# Altium PCB Pod_Islands_Panel.PcbDoc (part 5 of 10)
Units mm, origin at the board's own origin, x right, y up, seen from the top; angles counter-clockwise.
Board outline 95.7 x 83.7 mm, 6 copper layers (Top Layer, Inner1, Inner2, Inner3, Inner4, Bottom Layer), stack 0.82 mm thick; 1100 components, 940 nets, 4944 pads, 3680 vias.
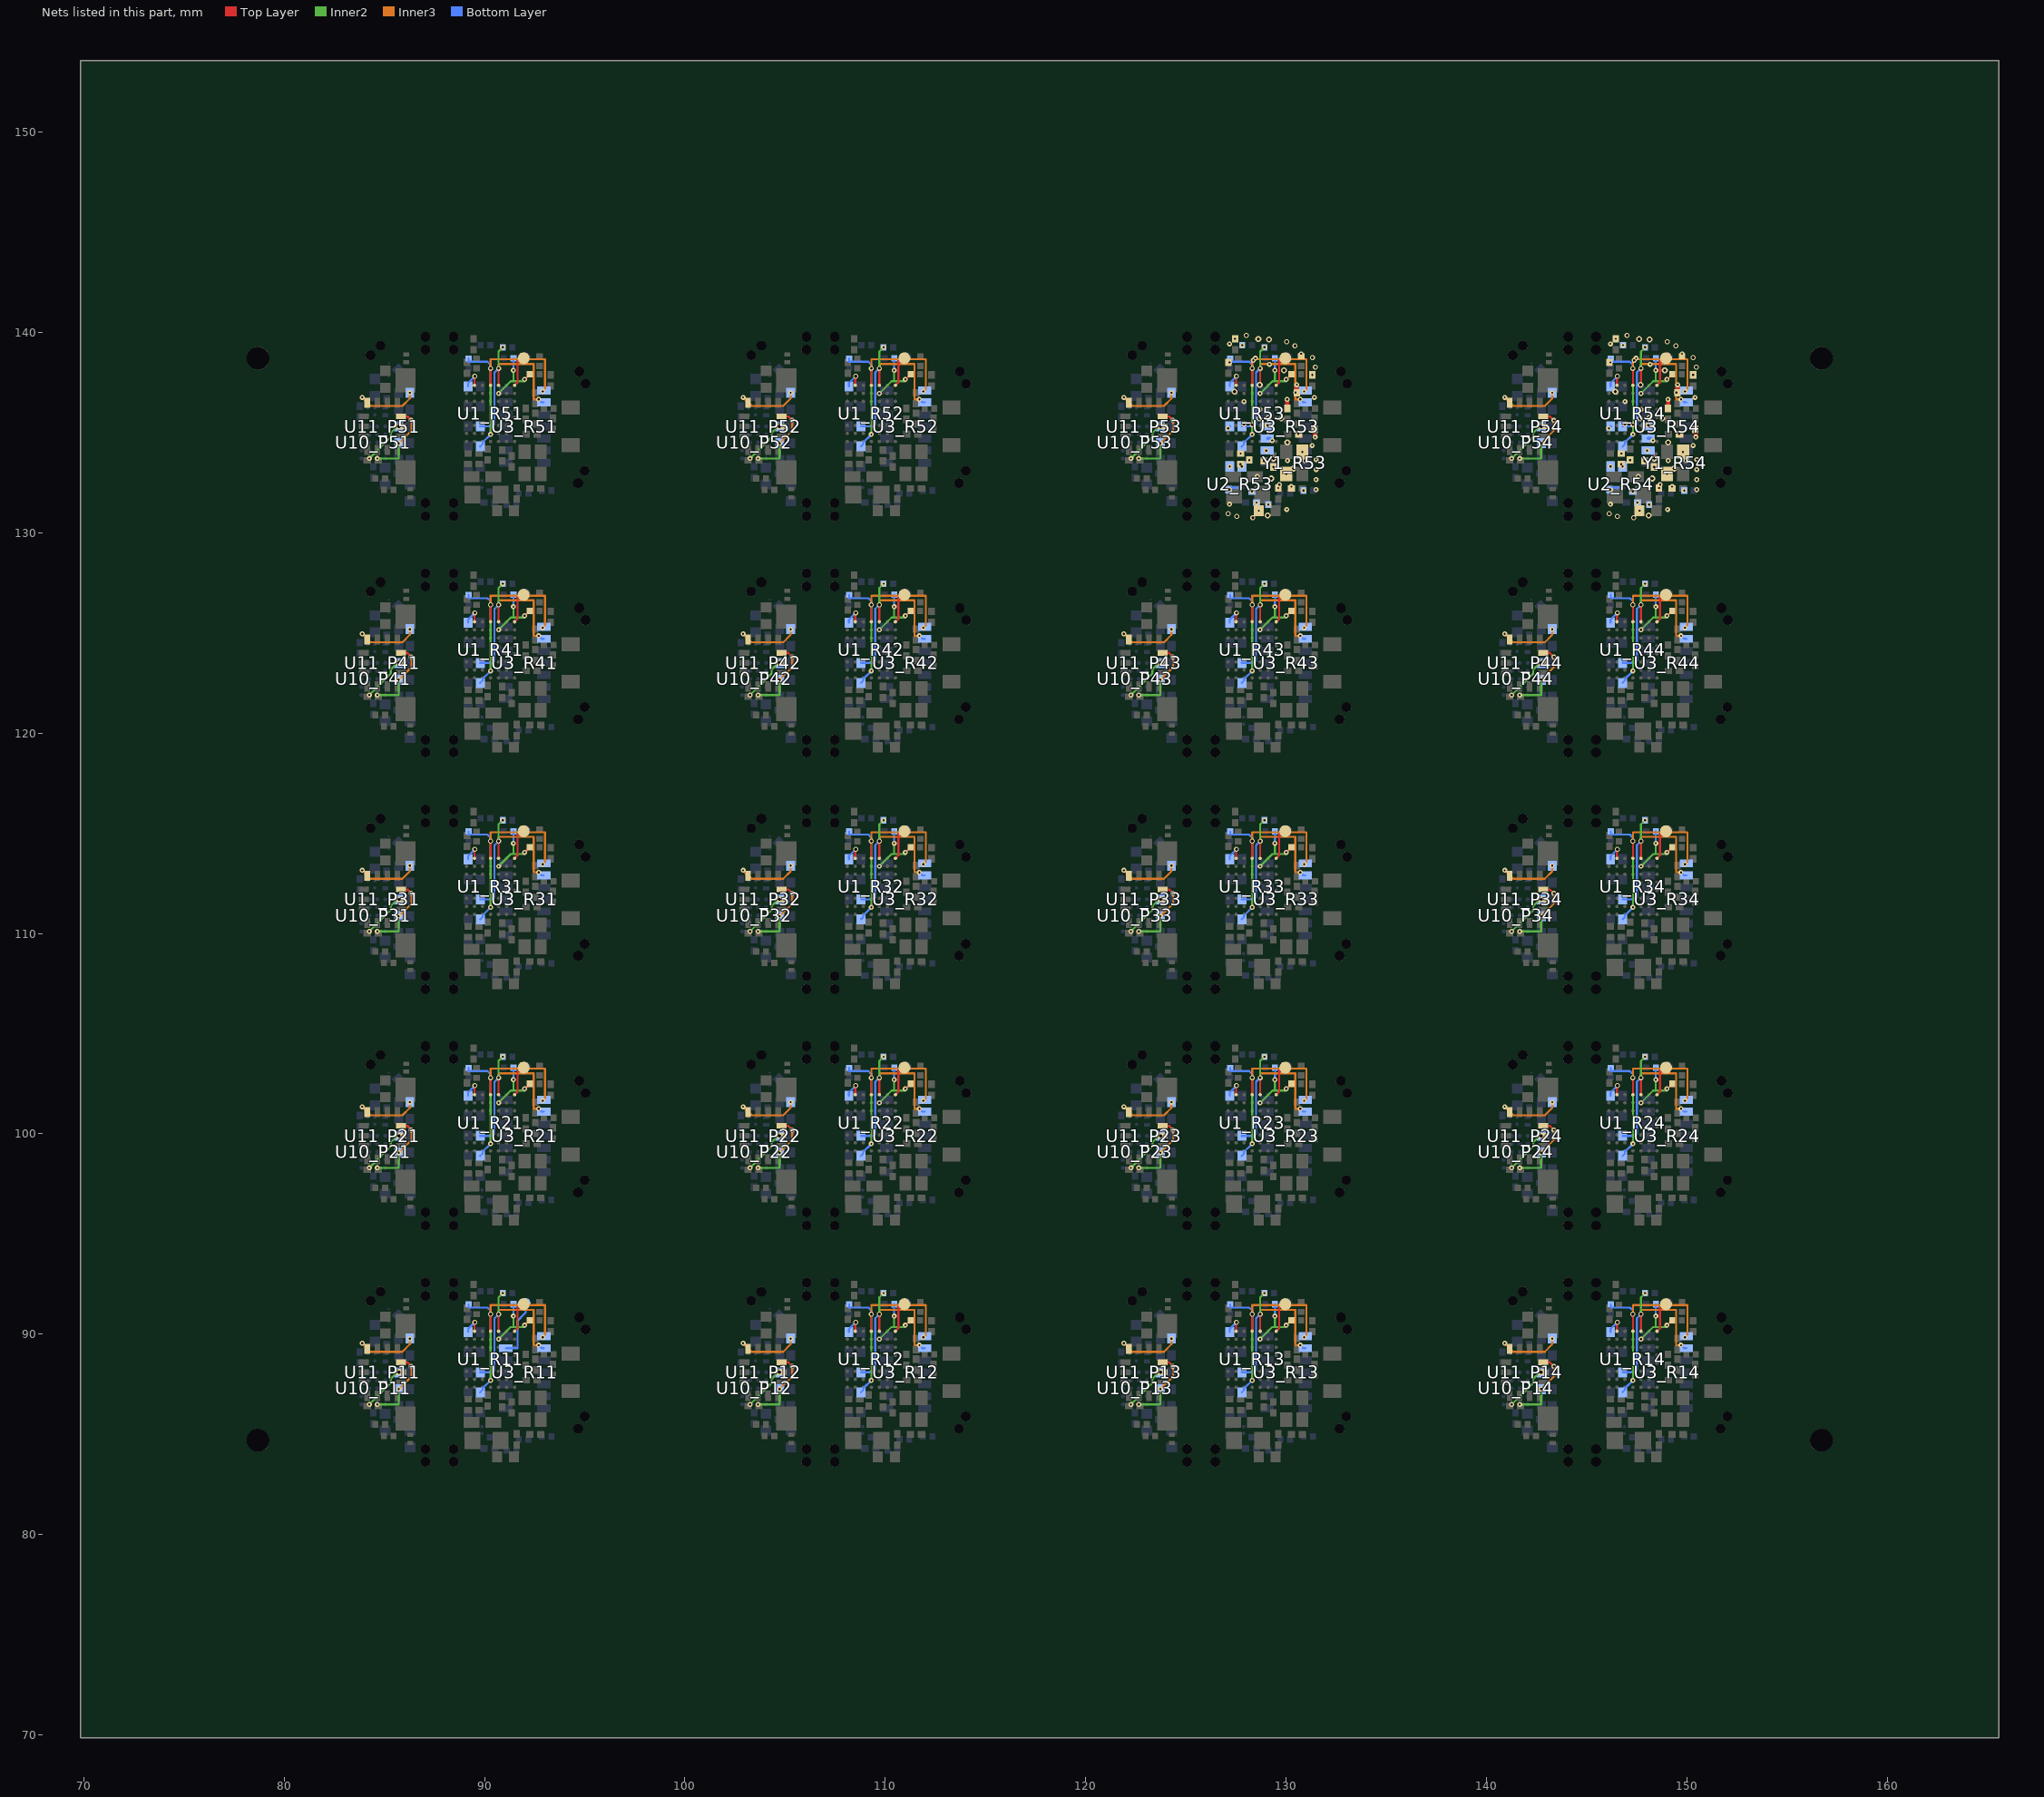
[diagram p9: the nets of this part, all layers, seen from the top]

## Via types
v1: diameter 0.249, hole 0.102, Top Layer to Inner1, 920 vias
v2: diameter 0.249, hole 0.102, Inner1 to Bottom Layer, 740 vias
v3: diameter 0.249, hole 0.102, Top Layer to Inner4, 580 vias
v4: diameter 0.249, hole 0.152, Top Layer to Bottom Layer, 540 vias
v5: diameter 0.249, hole 0.102, Inner4 to Bottom Layer, 520 vias
v6: diameter 0.3, hole 0.152, Inner1 to Inner4, 380 vias

## Nets (pads, with @x,y where several pads share a name; then routed paths per layer and width w, separated by ;. In a path a pad name is that pad's centre, name@x,y a point inside that pad or via, vN(x,y) a via of type N, cw(c..) or ccw(c..) an arc to the next point about the centre after c; other vN are vias at no path point) (continued)
GND_R53: C1_R53.2 C2_R53.2 C3_R53.2 C4_R53.2 C5_R53.2 C6_R53.2 C7_R53.2 C8_R53.2 C9_R53.2 C10_R53.2 C12_R53.2 C20_R53.2 C21_R53.2 C30_R53.2 C31_R53.2 C32_R53.2 C40_R53.2 C42_R53.2 pad.JR1@127.186,133.301 pad.JR3@127.186,135.3 pad.JR6@127.785,133.301 R5_R53.2 R41_R53.2 TH1_R53.2 TH4_R53.2 U1_R53.C4 U1_R53.C5 U1_R53.D2 U1_R53.E3 U1_R53.F5 U2_R53.B2 U3_R53.9 U3_R53.10 U3_R53.11 Y1_R53.2 Y1_R53.4 | length 2.1
  Top Layer w0.15: U1_R53.C4@128.3,135.35 v1(128.3,135.38)
  Top Layer w0.2: C3_R53.2@130.05,136.201 v1(130.05,136.65) ; C42_R53.2@130.53,136.986 v1(130.53,137.386) ; C40_R53.2@131.412,135.154 v1(131.442,134.764)
  Bottom Layer w0.15: v5(127.1,135.2) 127.185,135.285 pad.JR3@127.185,135.299 ; v2(127.176,132.147) 127.228,132.246 U2_R53.B2@127.525,132.245 ; U3_R53.10@129.06,134.7 129.2,134.7 v5(129.3,134.6)
  other v1: 128.63,131.09 130.03,131.16 131.485,132.15 129.601,132.223 130.256,132.3 131.485,132.65 129.999,132.929 131.485,133.15 129.359,133.275 127.718,133.42 128.88,133.577 128.16,133.623 131.485,133.65 127.723,133.95 130.799,134.031 131.3,134.35 130.6,134.93 127.899,135.41 129.1,135.751 128.699,136.15 127.899,136.549 131.4,136.75 130.47,136.986 131.3,137.875 129.16,138.4 127.172,138.494 128.36,138.6
  other v2: 127.176,131.415 127.176,139.42
  other v3: 130.751,138.922 127.449,139.676
  other v4: 128.336,130.739 127.529,130.806 127.11,130.95 131.46,138.25 131.306,138.731 130.442,139.325 130.021,139.523 128.01,139.85
  other v5: 130.03,131.16 129.108,131.4 128.524,131.499 128.295,132.05 130.858,132.101 129.66,132.4 128.56,132.8 127.185,133.3 127.784,133.3 130.06,133.6 129.01,134.09 129.06,135.359 128.46,138.7 127.807,139.35
  other v6: 129.081,130.865 129.26,132.7 130.36,133.2 130.96,133.6 129.37,133.7 130.06,134.5 128.66,135.7 129.76,135.7 127.42,137.035 128.676,137.374 129.89,138.1 129.135,139.639 128.611,139.669
GND_R54: C1_R54.2 C2_R54.2 C3_R54.2 C4_R54.2 C5_R54.2 C6_R54.2 C7_R54.2 C8_R54.2 C9_R54.2 C10_R54.2 C12_R54.2 C20_R54.2 C21_R54.2 C30_R54.2 C31_R54.2 C32_R54.2 C40_R54.2 C42_R54.2 pad.JR1@146.185,133.301 pad.JR3@146.185,135.3 pad.JR6@146.785,133.301 R5_R54.2 R41_R54.2 TH1_R54.2 TH4_R54.2 U1_R54.C4 U1_R54.C5 U1_R54.D2 U1_R54.E3 U1_R54.F5 U2_R54.B2 U3_R54.9 U3_R54.10 U3_R54.11 Y1_R54.2 Y1_R54.4 | length 2.1
  Top Layer w0.15: U1_R54.C4@147.3,135.35 v1(147.3,135.38)
  Top Layer w0.2: C3_R54.2@149.05,136.201 v1(149.05,136.65) ; C42_R54.2@149.53,136.986 v1(149.53,137.386) ; C40_R54.2@150.412,135.154 v1(150.442,134.764)
  Bottom Layer w0.15: v5(146.1,135.2) 146.185,135.285 pad.JR3@146.185,135.299 ; v2(146.176,132.147) 146.228,132.246 U2_R54.B2@146.525,132.245 ; U3_R54.10@148.06,134.7 148.2,134.7 v5(148.3,134.6)
  other v1: 147.63,131.09 149.03,131.16 150.485,132.15 148.601,132.223 149.256,132.3 150.485,132.65 148.999,132.929 150.485,133.15 148.359,133.275 146.718,133.42 147.88,133.577 147.16,133.623 150.485,133.65 146.723,133.95 149.799,134.031 150.3,134.35 149.6,134.93 146.899,135.41 148.1,135.751 147.699,136.15 146.899,136.549 150.4,136.75 149.47,136.986 150.3,137.875 148.16,138.4 146.172,138.494 147.36,138.6
  other v2: 146.176,131.415 146.176,139.42
  other v3: 149.751,138.922 146.449,139.676
  other v4: 147.336,130.739 146.529,130.806 146.11,130.95 150.46,138.25 150.306,138.731 149.442,139.325 149.021,139.523 147.01,139.85
  other v5: 149.03,131.16 148.108,131.4 147.524,131.499 147.295,132.05 149.858,132.101 148.66,132.4 147.56,132.8 146.185,133.3 146.784,133.3 149.06,133.6 148.01,134.09 148.06,135.359 147.46,138.7 146.807,139.35
  other v6: 148.081,130.865 148.26,132.7 149.36,133.2 149.96,133.6 148.37,133.7 149.06,134.5 147.66,135.7 148.76,135.7 146.42,137.035 147.676,137.374 148.89,138.1 148.135,139.639 147.611,139.669
I2C_SCL_P11: pad.JP8@85.723,88.099 U10_P11.E3 U11_P11.13 | length 2.3
  Inner2 w0.1: v2(84.251,86.499) 85.325,87.573 85.325,87.775 85.649,88.099 v4(85.724,88.099)
I2C_SCL_P12: pad.JP8@104.725,88.099 U10_P12.E3 U11_P12.13 | length 2.3
  Inner2 w0.1: v2(103.251,86.499) 104.325,87.573 104.325,87.775 104.649,88.099 v4(104.724,88.099)
I2C_SCL_P13: pad.JP8@123.724,88.099 U10_P13.E3 U11_P13.13 | length 2.3
  Inner2 w0.1: v2(122.251,86.499) 123.325,87.573 123.325,87.775 123.649,88.099 v4(123.724,88.099)
I2C_SCL_P14: pad.JP8@142.723,88.099 U10_P14.E3 U11_P14.13 | length 2.3
  Inner2 w0.1: v2(141.251,86.499) 142.325,87.573 142.325,87.775 142.649,88.099 v4(142.724,88.099)
I2C_SCL_P21: pad.JP8@85.723,99.9 U10_P21.E3 U11_P21.13 | length 2.3
  Inner2 w0.1: v2(84.251,98.299) 85.325,99.373 85.325,99.575 85.649,99.899 v4(85.724,99.899)
I2C_SCL_P22: pad.JP8@104.725,99.9 U10_P22.E3 U11_P22.13 | length 2.3
  Inner2 w0.1: v2(103.251,98.299) 104.325,99.373 104.325,99.575 104.649,99.899 v4(104.724,99.899)
I2C_SCL_P23: pad.JP8@123.724,99.9 U10_P23.E3 U11_P23.13 | length 2.3
  Inner2 w0.1: v2(122.251,98.299) 123.325,99.373 123.325,99.575 123.649,99.899 v4(123.724,99.899)
I2C_SCL_P24: pad.JP8@142.723,99.9 U10_P24.E3 U11_P24.13 | length 2.3
  Inner2 w0.1: v2(141.251,98.299) 142.325,99.373 142.325,99.575 142.649,99.899 v4(142.724,99.899)
I2C_SCL_P31: pad.JP8@85.723,111.698 U10_P31.E3 U11_P31.13 | length 2.3
  Inner2 w0.1: v2(84.251,110.099) 85.325,111.173 85.325,111.375 85.649,111.699 v4(85.724,111.699)
I2C_SCL_P32: pad.JP8@104.725,111.698 U10_P32.E3 U11_P32.13 | length 2.3
  Inner2 w0.1: v2(103.251,110.099) 104.325,111.173 104.325,111.375 104.649,111.699 v4(104.724,111.699)
I2C_SCL_P33: pad.JP8@123.724,111.698 U10_P33.E3 U11_P33.13 | length 2.3
  Inner2 w0.1: v2(122.251,110.099) 123.325,111.173 123.325,111.375 123.649,111.699 v4(123.724,111.699)
I2C_SCL_P34: pad.JP8@142.723,111.698 U10_P34.E3 U11_P34.13 | length 2.3
  Inner2 w0.1: v2(141.251,110.099) 142.325,111.173 142.325,111.375 142.649,111.699 v4(142.724,111.699)
I2C_SCL_P41: pad.JP8@85.723,123.499 U10_P41.E3 U11_P41.13 | length 2.3
  Inner2 w0.1: v2(84.251,121.899) 85.325,122.973 85.325,123.175 85.649,123.499 v4(85.724,123.499)
I2C_SCL_P42: pad.JP8@104.725,123.499 U10_P42.E3 U11_P42.13 | length 2.3
  Inner2 w0.1: v2(103.251,121.899) 104.325,122.973 104.325,123.175 104.649,123.499 v4(104.724,123.499)
I2C_SCL_P43: pad.JP8@123.724,123.499 U10_P43.E3 U11_P43.13 | length 2.3
  Inner2 w0.1: v2(122.251,121.899) 123.325,122.973 123.325,123.175 123.649,123.499 v4(123.724,123.499)
I2C_SCL_P44: pad.JP8@142.723,123.499 U10_P44.E3 U11_P44.13 | length 2.3
  Inner2 w0.1: v2(141.251,121.899) 142.325,122.973 142.325,123.175 142.649,123.499 v4(142.724,123.499)
I2C_SCL_P51: pad.JP8@85.723,135.3 U10_P51.E3 U11_P51.13 | length 2.3
  Inner2 w0.1: v2(84.251,133.699) 85.325,134.773 85.325,134.975 85.649,135.299 v4(85.724,135.299)
I2C_SCL_P52: pad.JP8@104.725,135.3 U10_P52.E3 U11_P52.13 | length 2.3
  Inner2 w0.1: v2(103.251,133.699) 104.325,134.773 104.325,134.975 104.649,135.299 v4(104.724,135.299)
I2C_SCL_P53: pad.JP8@123.724,135.3 U10_P53.E3 U11_P53.13 | length 2.3
  Inner2 w0.1: v2(122.251,133.699) 123.325,134.773 123.325,134.975 123.649,135.299 v4(123.724,135.299)
I2C_SCL_P54: pad.JP8@142.723,135.3 U10_P54.E3 U11_P54.13 | length 2.3
  Inner2 w0.1: v2(141.251,133.699) 142.325,134.773 142.325,134.975 142.649,135.299 v4(142.724,135.299)
I2C_SCL_R11: pad.JR8@89.784,88.099 R2_R11.2 U1_R11.H3 U3_R11.2 | length 9.9
  Top Layer w0.1: U1_R11.H3@90.699,90.149 v4(90.7,91)
  Inner2 w0.1: v4(90.7,91) 90.7,91.839 v2(90.91,92.049)
  Inner3 w0.1: v4(90.7,91) 90.7,91.22 92.45,91.22 92.45,89.45 v2(92.7,89.45)
  Bottom Layer w0.1: pad.JR8@89.784,88.099 90.4,88.099 90.5,88.2 90.5,90.8 v4(90.7,91) ; v2(92.7,89.45) 92.85,89.301 U3_R11.2@92.959,89.301
I2C_SCL_R12: pad.JR8@108.784,88.099 R2_R12.2 U1_R12.H3 U3_R12.2 | length 9.9
  Top Layer w0.1: U1_R12.H3@109.7,90.15 v4(109.7,91)
  Inner2 w0.1: v4(109.7,91) 109.7,91.839 v2(109.91,92.049)
  Inner3 w0.1: v4(109.7,91) 109.7,91.22 111.45,91.22 111.45,89.45 v2(111.7,89.45)
  Bottom Layer w0.1: pad.JR8@108.784,88.099 109.4,88.099 109.5,88.2 109.5,90.8 v4(109.7,91) ; v2(111.7,89.45) 111.85,89.301 U3_R12.2@111.959,89.301
I2C_SCL_R13: pad.JR8@127.785,88.099 R2_R13.2 U1_R13.H3 U3_R13.2 | length 9.9
  Top Layer w0.1: U1_R13.H3@128.7,90.15 v4(128.7,91)
  Inner2 w0.1: v4(128.7,91) 128.7,91.839 v2(128.91,92.049)
  Inner3 w0.1: v4(128.7,91) 128.7,91.22 130.45,91.22 130.45,89.45 v2(130.7,89.45)
  Bottom Layer w0.1: pad.JR8@127.785,88.099 128.4,88.099 128.5,88.2 128.5,90.8 v4(128.7,91) ; v2(130.7,89.45) 130.85,89.301 U3_R13.2@130.959,89.301
I2C_SCL_R14: pad.JR8@146.785,88.099 R2_R14.2 U1_R14.H3 U3_R14.2 | length 9.9
  Top Layer w0.1: U1_R14.H3@147.699,90.149 v4(147.7,91)
  Inner2 w0.1: v4(147.7,91) 147.7,91.839 v2(147.91,92.049)
  Inner3 w0.1: v4(147.7,91) 147.7,91.22 149.45,91.22 149.45,89.45 v2(149.7,89.45)
  Bottom Layer w0.1: pad.JR8@146.785,88.099 147.4,88.099 147.5,88.2 147.5,90.8 v4(147.7,91) ; v2(149.7,89.45) 149.85,89.301 U3_R14.2@149.959,89.301
I2C_SCL_R21: pad.JR8@89.784,99.9 R2_R21.2 U1_R21.H3 U3_R21.2 | length 9.9
  Top Layer w0.1: U1_R21.H3@90.699,101.949 v4(90.7,102.8)
  Inner2 w0.1: v4(90.7,102.8) 90.7,103.639 v2(90.91,103.849)
  Inner3 w0.1: v4(90.7,102.8) 90.7,103.02 92.45,103.02 92.45,101.25 v2(92.7,101.25)
  Bottom Layer w0.1: pad.JR8@89.784,99.899 90.4,99.899 90.5,100 90.5,102.6 v4(90.7,102.8) ; v2(92.7,101.25) 92.85,101.101 U3_R21.2@92.96,101.1
I2C_SCL_R22: pad.JR8@108.784,99.9 R2_R22.2 U1_R22.H3 U3_R22.2 | length 9.9
  Top Layer w0.1: U1_R22.H3@109.699,101.949 v4(109.7,102.8)
  Inner2 w0.1: v4(109.7,102.8) 109.7,103.639 v2(109.91,103.849)
  Inner3 w0.1: v4(109.7,102.8) 109.7,103.02 111.45,103.02 111.45,101.25 v2(111.7,101.25)
  Bottom Layer w0.1: pad.JR8@108.784,99.899 109.4,99.899 109.5,100 109.5,102.6 v4(109.7,102.8) ; v2(111.7,101.25) 111.85,101.101 U3_R22.2@111.96,101.1
I2C_SCL_R23: pad.JR8@127.785,99.9 R2_R23.2 U1_R23.H3 U3_R23.2 | length 9.9
  Top Layer w0.1: U1_R23.H3@128.699,101.949 v4(128.7,102.8)
  Inner2 w0.1: v4(128.7,102.8) 128.7,103.639 v2(128.91,103.849)
  Inner3 w0.1: v4(128.7,102.8) 128.7,103.02 130.45,103.02 130.45,101.25 v2(130.7,101.25)
  Bottom Layer w0.1: pad.JR8@127.784,99.899 128.4,99.899 128.5,100 128.5,102.6 v4(128.7,102.8) ; v2(130.7,101.25) 130.85,101.101 U3_R23.2@130.96,101.1
I2C_SCL_R24: pad.JR8@146.785,99.9 R2_R24.2 U1_R24.H3 U3_R24.2 | length 9.9
  Top Layer w0.1: U1_R24.H3@147.699,101.949 v4(147.7,102.8)
  Inner2 w0.1: v4(147.7,102.8) 147.7,103.639 v2(147.91,103.849)
  Inner3 w0.1: v4(147.7,102.8) 147.7,103.02 149.45,103.02 149.45,101.25 v2(149.7,101.25)
  Bottom Layer w0.1: pad.JR8@146.784,99.899 147.4,99.899 147.5,100 147.5,102.6 v4(147.7,102.8) ; v2(149.7,101.25) 149.85,101.101 U3_R24.2@149.96,101.1
I2C_SCL_R31: pad.JR8@89.784,111.698 R2_R31.2 U1_R31.H3 U3_R31.2 | length 9.9
  Top Layer w0.1: U1_R31.H3@90.699,113.749 v4(90.7,114.6)
  Inner2 w0.1: v4(90.7,114.6) 90.7,115.439 v2(90.91,115.649)
  Inner3 w0.1: v4(90.7,114.6) 90.7,114.82 92.45,114.82 92.45,113.05 v2(92.7,113.05)
  Bottom Layer w0.1: pad.JR8@89.784,111.698 90.4,111.699 90.5,111.8 90.5,114.4 v4(90.7,114.6) ; v2(92.7,113.05) 92.85,112.901 U3_R31.2@92.96,112.9
I2C_SCL_R32: pad.JR8@108.784,111.698 R2_R32.2 U1_R32.H3 U3_R32.2 | length 9.9
  Top Layer w0.1: U1_R32.H3@109.7,113.75 v4(109.7,114.6)
  Inner2 w0.1: v4(109.7,114.6) 109.7,115.439 v2(109.91,115.649)
  Inner3 w0.1: v4(109.7,114.6) 109.7,114.82 111.45,114.82 111.45,113.05 v2(111.7,113.05)
  Bottom Layer w0.1: pad.JR8@108.784,111.699 109.4,111.699 109.5,111.8 109.5,114.4 v4(109.7,114.6) ; v2(111.7,113.05) 111.85,112.901 U3_R32.2@111.96,112.9
I2C_SCL_R33: pad.JR8@127.785,111.698 R2_R33.2 U1_R33.H3 U3_R33.2 | length 9.9
  Top Layer w0.1: U1_R33.H3@128.7,113.75 v4(128.7,114.6)
  Inner2 w0.1: v4(128.7,114.6) 128.7,115.439 v2(128.91,115.649)
  Inner3 w0.1: v4(128.7,114.6) 128.7,114.82 130.45,114.82 130.45,113.05 v2(130.7,113.05)
  Bottom Layer w0.1: pad.JR8@127.785,111.698 128.4,111.699 128.5,111.8 128.5,114.4 v4(128.7,114.6) ; v2(130.7,113.05) 130.85,112.901 U3_R33.2@130.96,112.9
I2C_SCL_R34: pad.JR8@146.785,111.698 R2_R34.2 U1_R34.H3 U3_R34.2 | length 9.9
  Top Layer w0.1: U1_R34.H3@147.699,113.749 v4(147.7,114.6)
  Inner2 w0.1: v4(147.7,114.6) 147.7,115.439 v2(147.91,115.649)
  Inner3 w0.1: v4(147.7,114.6) 147.7,114.82 149.45,114.82 149.45,113.05 v2(149.7,113.05)
  Bottom Layer w0.1: pad.JR8@146.785,111.698 147.4,111.699 147.5,111.8 147.5,114.4 v4(147.7,114.6) ; v2(149.7,113.05) 149.85,112.901 U3_R34.2@149.96,112.9
I2C_SCL_R41: pad.JR8@89.784,123.499 R2_R41.2 U1_R41.H3 U3_R41.2 | length 9.9
  Top Layer w0.1: U1_R41.H3@90.699,125.549 v4(90.7,126.4)
  Inner2 w0.1: v4(90.7,126.4) 90.7,127.239 v2(90.91,127.449)
  Inner3 w0.1: v4(90.7,126.4) 90.7,126.62 92.45,126.62 92.45,124.85 v2(92.7,124.85)
  Bottom Layer w0.1: pad.JR8@89.784,123.499 90.4,123.499 90.5,123.6 90.5,126.2 v4(90.7,126.4) ; v2(92.7,124.85) 92.85,124.701 U3_R41.2@92.959,124.701
I2C_SCL_R42: pad.JR8@108.784,123.499 R2_R42.2 U1_R42.H3 U3_R42.2 | length 9.9
  Top Layer w0.1: U1_R42.H3@109.7,125.55 v4(109.7,126.4)
  Inner2 w0.1: v4(109.7,126.4) 109.7,127.239 v2(109.91,127.449)
  Inner3 w0.1: v4(109.7,126.4) 109.7,126.62 111.45,126.62 111.45,124.85 v2(111.7,124.85)
  Bottom Layer w0.1: pad.JR8@108.784,123.499 109.4,123.499 109.5,123.6 109.5,126.2 v4(109.7,126.4) ; v2(111.7,124.85) 111.85,124.701 U3_R42.2@111.959,124.701
I2C_SCL_R43: pad.JR8@127.785,123.499 R2_R43.2 U1_R43.H3 U3_R43.2 | length 9.9
  Top Layer w0.1: U1_R43.H3@128.7,125.55 v4(128.7,126.4)
  Inner2 w0.1: v4(128.7,126.4) 128.7,127.239 v2(128.91,127.449)
  Inner3 w0.1: v4(128.7,126.4) 128.7,126.62 130.45,126.62 130.45,124.85 v2(130.7,124.85)
  Bottom Layer w0.1: pad.JR8@127.785,123.499 128.4,123.499 128.5,123.6 128.5,126.2 v4(128.7,126.4) ; v2(130.7,124.85) 130.85,124.701 U3_R43.2@130.959,124.701
I2C_SCL_R44: pad.JR8@146.785,123.499 R2_R44.2 U1_R44.H3 U3_R44.2 | length 9.9
  Top Layer w0.1: U1_R44.H3@147.699,125.549 v4(147.7,126.4)
  Inner2 w0.1: v4(147.7,126.4) 147.7,127.239 v2(147.91,127.449)
  Inner3 w0.1: v4(147.7,126.4) 147.7,126.62 149.45,126.62 149.45,124.85 v2(149.7,124.85)
  Bottom Layer w0.1: pad.JR8@146.785,123.499 147.4,123.499 147.5,123.6 147.5,126.2 v4(147.7,126.4) ; v2(149.7,124.85) 149.85,124.701 U3_R44.2@149.959,124.701
I2C_SCL_R51: pad.JR8@89.784,135.3 R2_R51.2 U1_R51.H3 U3_R51.2 | length 9.9
  Top Layer w0.1: U1_R51.H3@90.699,137.349 v4(90.7,138.2)
  Inner2 w0.1: v4(90.7,138.2) 90.7,139.039 v2(90.91,139.249)
  Inner3 w0.1: v4(90.7,138.2) 90.7,138.42 92.45,138.42 92.45,136.65 v2(92.7,136.65)
  Bottom Layer w0.1: pad.JR8@89.784,135.299 90.4,135.299 90.5,135.4 90.5,138 v4(90.7,138.2) ; v2(92.7,136.65) 92.85,136.501 U3_R51.2@92.96,136.5
I2C_SCL_R52: pad.JR8@108.784,135.3 R2_R52.2 U1_R52.H3 U3_R52.2 | length 9.9
  Top Layer w0.1: U1_R52.H3@109.699,137.349 v4(109.7,138.2)
  Inner2 w0.1: v4(109.7,138.2) 109.7,139.039 v2(109.91,139.249)
  Inner3 w0.1: v4(109.7,138.2) 109.7,138.42 111.45,138.42 111.45,136.65 v2(111.7,136.65)
  Bottom Layer w0.1: pad.JR8@108.784,135.299 109.4,135.299 109.5,135.4 109.5,138 v4(109.7,138.2) ; v2(111.7,136.65) 111.85,136.501 U3_R52.2@111.96,136.5
I2C_SCL_R53: pad.JR8@127.785,135.3 R2_R53.2 U1_R53.H3 U3_R53.2 | length 9.9
  Top Layer w0.1: U1_R53.H3@128.699,137.349 v4(128.7,138.2)
  Inner2 w0.1: v4(128.7,138.2) 128.7,139.039 v2(128.91,139.249)
  Inner3 w0.1: v4(128.7,138.2) 128.7,138.42 130.45,138.42 130.45,136.65 v2(130.7,136.65)
  Bottom Layer w0.1: pad.JR8@127.784,135.299 128.4,135.299 128.5,135.4 128.5,138 v4(128.7,138.2) ; v2(130.7,136.65) 130.85,136.501 U3_R53.2@130.96,136.5
I2C_SCL_R54: pad.JR8@146.785,135.3 R2_R54.2 U1_R54.H3 U3_R54.2 | length 9.9
  Top Layer w0.1: U1_R54.H3@147.699,137.349 v4(147.7,138.2)
  Inner2 w0.1: v4(147.7,138.2) 147.7,139.039 v2(147.91,139.249)
  Inner3 w0.1: v4(147.7,138.2) 147.7,138.42 149.45,138.42 149.45,136.65 v2(149.7,136.65)
  Bottom Layer w0.1: pad.JR8@146.784,135.299 147.4,135.299 147.5,135.4 147.5,138 v4(147.7,138.2) ; v2(149.7,136.65) 149.85,136.501 U3_R54.2@149.96,136.5
I2C_SDA_P11: pad.JP7@85.723,87.261 U10_P11.E2 U11_P11.14 | length 3.8
  Top Layer w0.1: U11_P11.14@85.826,88.6 86.151,88.6 v3(86.35,88.4)
  Inner2 w0.1: v2(84.65,86.499) 85.724,86.499 v2(85.724,87.261)
  Inner3 w0.1: v2(85.724,87.261) 86.35,87.887 v3(86.35,88.4)
I2C_SDA_P12: pad.JP7@104.725,87.261 U10_P12.E2 U11_P12.14 | length 3.8
  Top Layer w0.1: U11_P12.14@104.825,88.6 105.151,88.6 v3(105.35,88.4)
  Inner2 w0.1: v2(103.65,86.499) 104.724,86.499 v2(104.724,87.261)
  Inner3 w0.1: v2(104.724,87.261) 105.35,87.887 v3(105.35,88.4)
I2C_SDA_P13: pad.JP7@123.724,87.261 U10_P13.E2 U11_P13.14 | length 3.8
  Top Layer w0.1: U11_P13.14@123.825,88.6 124.151,88.6 v3(124.35,88.4)
  Inner2 w0.1: v2(122.65,86.499) 123.724,86.499 v2(123.724,87.261)
  Inner3 w0.1: v2(123.724,87.261) 124.35,87.887 v3(124.35,88.4)
I2C_SDA_P14: pad.JP7@142.723,87.261 U10_P14.E2 U11_P14.14 | length 3.8
  Top Layer w0.1: U11_P14.14@142.826,88.6 143.151,88.6 v3(143.35,88.4)
  Inner2 w0.1: v2(141.65,86.499) 142.724,86.499 v2(142.724,87.261)
  Inner3 w0.1: v2(142.724,87.261) 143.35,87.887 v3(143.35,88.4)
I2C_SDA_P21: pad.JP7@85.723,99.062 U10_P21.E2 U11_P21.14 | length 3.8
  Top Layer w0.1: U11_P21.14@85.826,100.4 86.151,100.4 v3(86.35,100.2)
  Inner2 w0.1: v2(84.65,98.299) 85.724,98.299 v2(85.724,99.061)
  Inner3 w0.1: v2(85.724,99.061) 86.35,99.687 v3(86.35,100.2)
I2C_SDA_P22: pad.JP7@104.725,99.062 U10_P22.E2 U11_P22.14 | length 3.8
  Top Layer w0.1: U11_P22.14@104.826,100.4 105.151,100.4 v3(105.35,100.2)
  Inner2 w0.1: v2(103.65,98.299) 104.724,98.299 v2(104.724,99.061)
  Inner3 w0.1: v2(104.724,99.061) 105.35,99.687 v3(105.35,100.2)
I2C_SDA_P23: pad.JP7@123.724,99.062 U10_P23.E2 U11_P23.14 | length 3.8
  Top Layer w0.1: U11_P23.14@123.826,100.4 124.151,100.4 v3(124.35,100.2)
  Inner2 w0.1: v2(122.65,98.299) 123.724,98.299 v2(123.724,99.061)
  Inner3 w0.1: v2(123.724,99.061) 124.35,99.687 v3(124.35,100.2)
I2C_SDA_P24: pad.JP7@142.723,99.062 U10_P24.E2 U11_P24.14 | length 3.8
  Top Layer w0.1: U11_P24.14@142.826,100.4 143.151,100.4 v3(143.35,100.2)
  Inner2 w0.1: v2(141.65,98.299) 142.724,98.299 v2(142.724,99.061)
  Inner3 w0.1: v2(142.724,99.061) 143.35,99.687 v3(143.35,100.2)
I2C_SDA_P31: pad.JP7@85.723,110.86 U10_P31.E2 U11_P31.14 | length 3.8
  Top Layer w0.1: U11_P31.14@85.826,112.2 86.151,112.2 v3(86.35,112)
  Inner2 w0.1: v2(84.65,110.099) 85.724,110.099 v2(85.724,110.861)
  Inner3 w0.1: v2(85.724,110.861) 86.35,111.487 v3(86.35,112)
I2C_SDA_P32: pad.JP7@104.725,110.86 U10_P32.E2 U11_P32.14 | length 3.8
  Top Layer w0.1: U11_P32.14@104.825,112.2 105.151,112.2 v3(105.35,112)
  Inner2 w0.1: v2(103.65,110.099) 104.724,110.099 v2(104.724,110.861)
  Inner3 w0.1: v2(104.724,110.861) 105.35,111.487 v3(105.35,112)
I2C_SDA_P33: pad.JP7@123.724,110.86 U10_P33.E2 U11_P33.14 | length 3.8
  Top Layer w0.1: U11_P33.14@123.825,112.2 124.151,112.2 v3(124.35,112)
  Inner2 w0.1: v2(122.65,110.099) 123.724,110.099 v2(123.724,110.861)
  Inner3 w0.1: v2(123.724,110.861) 124.35,111.487 v3(124.35,112)
I2C_SDA_P34: pad.JP7@142.723,110.86 U10_P34.E2 U11_P34.14 | length 3.8
  Top Layer w0.1: U11_P34.14@142.826,112.2 143.151,112.2 v3(143.35,112)
  Inner2 w0.1: v2(141.65,110.099) 142.724,110.099 v2(142.724,110.861)
  Inner3 w0.1: v2(142.724,110.861) 143.35,111.487 v3(143.35,112)
I2C_SDA_P41: pad.JP7@85.723,122.661 U10_P41.E2 U11_P41.14 | length 3.8
  Top Layer w0.1: U11_P41.14@85.826,124 86.151,124 v3(86.35,123.8)
  Inner2 w0.1: v2(84.65,121.899) 85.724,121.899 v2(85.724,122.661)
  Inner3 w0.1: v2(85.724,122.661) 86.35,123.287 v3(86.35,123.8)
I2C_SDA_P42: pad.JP7@104.725,122.661 U10_P42.E2 U11_P42.14 | length 3.8
  Top Layer w0.1: U11_P42.14@104.825,124 105.151,124 v3(105.35,123.8)
  Inner2 w0.1: v2(103.65,121.899) 104.724,121.899 v2(104.724,122.661)
  Inner3 w0.1: v2(104.724,122.661) 105.35,123.287 v3(105.35,123.8)
I2C_SDA_P43: pad.JP7@123.724,122.661 U10_P43.E2 U11_P43.14 | length 3.8
  Top Layer w0.1: U11_P43.14@123.825,124 124.151,124 v3(124.35,123.8)
  Inner2 w0.1: v2(122.65,121.899) 123.724,121.899 v2(123.724,122.661)
  Inner3 w0.1: v2(123.724,122.661) 124.35,123.287 v3(124.35,123.8)
I2C_SDA_P44: pad.JP7@142.723,122.661 U10_P44.E2 U11_P44.14 | length 3.8
  Top Layer w0.1: U11_P44.14@142.826,124 143.151,124 v3(143.35,123.8)
  Inner2 w0.1: v2(141.65,121.899) 142.724,121.899 v2(142.724,122.661)
  Inner3 w0.1: v2(142.724,122.661) 143.35,123.287 v3(143.35,123.8)
I2C_SDA_P51: pad.JP7@85.723,134.462 U10_P51.E2 U11_P51.14 | length 3.8
  Top Layer w0.1: U11_P51.14@85.826,135.8 86.151,135.8 v3(86.35,135.6)
  Inner2 w0.1: v2(84.65,133.699) 85.724,133.699 v2(85.724,134.461)
  Inner3 w0.1: v2(85.724,134.461) 86.35,135.087 v3(86.35,135.6)
I2C_SDA_P52: pad.JP7@104.725,134.462 U10_P52.E2 U11_P52.14 | length 3.8
  Top Layer w0.1: U11_P52.14@104.826,135.8 105.151,135.8 v3(105.35,135.6)
  Inner2 w0.1: v2(103.65,133.699) 104.724,133.699 v2(104.724,134.461)
  Inner3 w0.1: v2(104.724,134.461) 105.35,135.087 v3(105.35,135.6)
I2C_SDA_P53: pad.JP7@123.724,134.462 U10_P53.E2 U11_P53.14 | length 3.8
  Top Layer w0.1: U11_P53.14@123.826,135.8 124.151,135.8 v3(124.35,135.6)
  Inner2 w0.1: v2(122.65,133.699) 123.724,133.699 v2(123.724,134.461)
  Inner3 w0.1: v2(123.724,134.461) 124.35,135.087 v3(124.35,135.6)
I2C_SDA_P54: pad.JP7@142.723,134.462 U10_P54.E2 U11_P54.14 | length 3.8
  Top Layer w0.1: U11_P54.14@142.826,135.8 143.151,135.8 v3(143.35,135.6)
  Inner2 w0.1: v2(141.65,133.699) 142.724,133.699 v2(142.724,134.461)
  Inner3 w0.1: v2(142.724,134.461) 143.35,135.087 v3(143.35,135.6)
I2C_SDA_R11: pad.JR7@89.784,87.101 R1_R11.2 U1_R11.H4 U3_R11.1 | length 11.3
  Top Layer w0.1: U1_R11.H4@90.3,90.15 v4(90.3,91)
  Inner2 w0.1: v2(90.3,87.7) v4(90.3,91)
  Inner3 w0.1: v4(90.3,91) 90.3,91.45 93.015,91.45 93.015,89.965 v2(92.9,89.85)
  Bottom Layer w0.1: R1_R11.2@89.2,91.493 89.2,91.33 90.15,91.33 90.3,91.18 v4(90.3,91) ; pad.JR7@89.784,87.101 89.9,87.217 89.9,87.3 v2(90.3,87.7)
I2C_SDA_R12: pad.JR7@108.784,87.101 R1_R12.2 U1_R12.H4 U3_R12.1 | length 11.3
  Top Layer w0.1: U1_R12.H4@109.3,90.15 v4(109.3,91)
  Inner2 w0.1: v2(109.3,87.7) v4(109.3,91)
  Inner3 w0.1: v4(109.3,91) 109.3,91.45 112.015,91.45 112.015,89.965 v2(111.9,89.85)
  Bottom Layer w0.1: R1_R12.2@108.2,91.493 108.2,91.33 109.15,91.33 109.3,91.18 v4(109.3,91) ; pad.JR7@108.784,87.101 108.9,87.217 108.9,87.3 v2(109.3,87.7)
I2C_SDA_R13: pad.JR7@127.785,87.101 R1_R13.2 U1_R13.H4 U3_R13.1 | length 11.3
  Top Layer w0.1: U1_R13.H4@128.3,90.15 v4(128.3,91)
  Inner2 w0.1: v2(128.3,87.7) v4(128.3,91)
  Inner3 w0.1: v4(128.3,91) 128.3,91.45 131.015,91.45 131.015,89.965 v2(130.9,89.85)
  Bottom Layer w0.1: R1_R13.2@127.2,91.493 127.2,91.33 128.15,91.33 128.3,91.18 v4(128.3,91) ; pad.JR7@127.785,87.101 127.9,87.217 127.9,87.3 v2(128.3,87.7)
I2C_SDA_R14: pad.JR7@146.785,87.101 R1_R14.2 U1_R14.H4 U3_R14.1 | length 11.3
  Top Layer w0.1: U1_R14.H4@147.3,90.15 v4(147.3,91)
  Inner2 w0.1: v2(147.3,87.7) v4(147.3,91)
  Inner3 w0.1: v4(147.3,91) 147.3,91.45 150.015,91.45 150.015,89.965 v2(149.9,89.85)
  Bottom Layer w0.1: R1_R14.2@146.2,91.493 146.2,91.33 147.15,91.33 147.3,91.18 v4(147.3,91) ; pad.JR7@146.785,87.101 146.9,87.217 146.9,87.3 v2(147.3,87.7)
I2C_SDA_R21: pad.JR7@89.784,98.902 R1_R21.2 U1_R21.H4 U3_R21.1 | length 11.3
  Top Layer w0.1: U1_R21.H4@90.3,101.949 v4(90.3,102.8)
  Inner2 w0.1: v2(90.3,99.5) v4(90.3,102.8)
  Inner3 w0.1: v4(90.3,102.8) 90.3,103.25 93.015,103.25 93.015,101.765 v2(92.9,101.65)
  Bottom Layer w0.1: R1_R21.2@89.2,103.292 89.2,103.13 90.15,103.13 90.3,102.98 v4(90.3,102.8) ; pad.JR7@89.784,98.901 89.9,99.017 89.9,99.1 v2(90.3,99.5)
I2C_SDA_R22: pad.JR7@108.784,98.902 R1_R22.2 U1_R22.H4 U3_R22.1 | length 11.3
  Top Layer w0.1: U1_R22.H4@109.3,101.949 v4(109.3,102.8)
  Inner2 w0.1: v2(109.3,99.5) v4(109.3,102.8)
  Inner3 w0.1: v4(109.3,102.8) 109.3,103.25 112.015,103.25 112.015,101.765 v2(111.9,101.65)
  Bottom Layer w0.1: R1_R22.2@108.2,103.293 108.2,103.13 109.15,103.13 109.3,102.98 v4(109.3,102.8) ; pad.JR7@108.784,98.901 108.9,99.017 108.9,99.1 v2(109.3,99.5)
I2C_SDA_R23: pad.JR7@127.785,98.902 R1_R23.2 U1_R23.H4 U3_R23.1 | length 11.3
  Top Layer w0.1: U1_R23.H4@128.3,101.949 v4(128.3,102.8)
  Inner2 w0.1: v2(128.3,99.5) v4(128.3,102.8)
  Inner3 w0.1: v4(128.3,102.8) 128.3,103.25 131.015,103.25 131.015,101.765 v2(130.9,101.65)
  Bottom Layer w0.1: R1_R23.2@127.2,103.292 127.2,103.13 128.15,103.13 128.3,102.98 v4(128.3,102.8) ; pad.JR7@127.784,98.901 127.9,99.017 127.9,99.1 v2(128.3,99.5)
I2C_SDA_R24: pad.JR7@146.785,98.902 R1_R24.2 U1_R24.H4 U3_R24.1 | length 11.3
  Top Layer w0.1: U1_R24.H4@147.3,101.949 v4(147.3,102.8)
  Inner2 w0.1: v2(147.3,99.5) v4(147.3,102.8)
  Inner3 w0.1: v4(147.3,102.8) 147.3,103.25 150.015,103.25 150.015,101.765 v2(149.9,101.65)
  Bottom Layer w0.1: R1_R24.2@146.2,103.292 146.2,103.13 147.15,103.13 147.3,102.98 v4(147.3,102.8) ; pad.JR7@146.784,98.901 146.9,99.017 146.9,99.1 v2(147.3,99.5)
I2C_SDA_R31: pad.JR7@89.784,110.7 R1_R31.2 U1_R31.H4 U3_R31.1 | length 11.3
  Top Layer w0.1: U1_R31.H4@90.3,113.75 v4(90.3,114.6)
  Inner2 w0.1: v2(90.3,111.3) v4(90.3,114.6)
  Inner3 w0.1: v4(90.3,114.6) 90.3,115.05 93.015,115.05 93.015,113.565 v2(92.9,113.45)
  Bottom Layer w0.1: R1_R31.2@89.2,115.092 89.2,114.93 90.15,114.93 90.3,114.78 v4(90.3,114.6) ; pad.JR7@89.784,110.7 89.9,110.817 89.9,110.9 v2(90.3,111.3)
I2C_SDA_R32: pad.JR7@108.784,110.7 R1_R32.2 U1_R32.H4 U3_R32.1 | length 11.3
  Top Layer w0.1: U1_R32.H4@109.3,113.75 v4(109.3,114.6)
  Inner2 w0.1: v2(109.3,111.3) v4(109.3,114.6)
  Inner3 w0.1: v4(109.3,114.6) 109.3,115.05 112.015,115.05 112.015,113.565 v2(111.9,113.45)
  Bottom Layer w0.1: R1_R32.2@108.2,115.093 108.2,114.93 109.15,114.93 109.3,114.78 v4(109.3,114.6) ; pad.JR7@108.784,110.701 108.9,110.817 108.9,110.9 v2(109.3,111.3)
I2C_SDA_R33: pad.JR7@127.785,110.7 R1_R33.2 U1_R33.H4 U3_R33.1 | length 11.3
  Top Layer w0.1: U1_R33.H4@128.3,113.75 v4(128.3,114.6)
  Inner2 w0.1: v2(128.3,111.3) v4(128.3,114.6)
  Inner3 w0.1: v4(128.3,114.6) 128.3,115.05 131.015,115.05 131.015,113.565 v2(130.9,113.45)
  Bottom Layer w0.1: R1_R33.2@127.2,115.092 127.2,114.93 128.15,114.93 128.3,114.78 v4(128.3,114.6) ; pad.JR7@127.785,110.7 127.9,110.817 127.9,110.9 v2(128.3,111.3)
I2C_SDA_R34: pad.JR7@146.785,110.7 R1_R34.2 U1_R34.H4 U3_R34.1 | length 11.3
  Top Layer w0.1: U1_R34.H4@147.3,113.75 v4(147.3,114.6)
  Inner2 w0.1: v2(147.3,111.3) v4(147.3,114.6)
  Inner3 w0.1: v4(147.3,114.6) 147.3,115.05 150.015,115.05 150.015,113.565 v2(149.9,113.45)
  Bottom Layer w0.1: R1_R34.2@146.2,115.092 146.2,114.93 147.15,114.93 147.3,114.78 v4(147.3,114.6) ; pad.JR7@146.785,110.7 146.9,110.817 146.9,110.9 v2(147.3,111.3)
I2C_SDA_R41: pad.JR7@89.784,122.501 R1_R41.2 U1_R41.H4 U3_R41.1 | length 11.3
  Top Layer w0.1: U1_R41.H4@90.3,125.55 v4(90.3,126.4)
  Inner2 w0.1: v2(90.3,123.1) v4(90.3,126.4)
  Inner3 w0.1: v4(90.3,126.4) 90.3,126.85 93.015,126.85 93.015,125.365 v2(92.9,125.25)
  Bottom Layer w0.1: R1_R41.2@89.2,126.893 89.2,126.73 90.15,126.73 90.3,126.58 v4(90.3,126.4) ; pad.JR7@89.784,122.501 89.9,122.617 89.9,122.7 v2(90.3,123.1)
I2C_SDA_R42: pad.JR7@108.784,122.501 R1_R42.2 U1_R42.H4 U3_R42.1 | length 11.3
  Top Layer w0.1: U1_R42.H4@109.3,125.55 v4(109.3,126.4)
  Inner2 w0.1: v2(109.3,123.1) v4(109.3,126.4)
  Inner3 w0.1: v4(109.3,126.4) 109.3,126.85 112.015,126.85 112.015,125.365 v2(111.9,125.25)
  Bottom Layer w0.1: R1_R42.2@108.2,126.893 108.2,126.73 109.15,126.73 109.3,126.58 v4(109.3,126.4) ; pad.JR7@108.784,122.501 108.9,122.617 108.9,122.7 v2(109.3,123.1)
I2C_SDA_R43: pad.JR7@127.785,122.501 R1_R43.2 U1_R43.H4 U3_R43.1 | length 11.3
  Top Layer w0.1: U1_R43.H4@128.3,125.55 v4(128.3,126.4)
  Inner2 w0.1: v2(128.3,123.1) v4(128.3,126.4)
  Inner3 w0.1: v4(128.3,126.4) 128.3,126.85 131.015,126.85 131.015,125.365 v2(130.9,125.25)
  Bottom Layer w0.1: R1_R43.2@127.2,126.893 127.2,126.73 128.15,126.73 128.3,126.58 v4(128.3,126.4) ; pad.JR7@127.785,122.501 127.9,122.617 127.9,122.7 v2(128.3,123.1)
I2C_SDA_R44: pad.JR7@146.785,122.501 R1_R44.2 U1_R44.H4 U3_R44.1 | length 11.3
  Top Layer w0.1: U1_R44.H4@147.3,125.55 v4(147.3,126.4)
  Inner2 w0.1: v2(147.3,123.1) v4(147.3,126.4)
  Inner3 w0.1: v4(147.3,126.4) 147.3,126.85 150.015,126.85 150.015,125.365 v2(149.9,125.25)
  Bottom Layer w0.1: R1_R44.2@146.2,126.893 146.2,126.73 147.15,126.73 147.3,126.58 v4(147.3,126.4) ; pad.JR7@146.785,122.501 146.9,122.617 146.9,122.7 v2(147.3,123.1)
I2C_SDA_R51: pad.JR7@89.784,134.302 R1_R51.2 U1_R51.H4 U3_R51.1 | length 11.3
  Top Layer w0.1: U1_R51.H4@90.3,137.349 v4(90.3,138.2)
  Inner2 w0.1: v2(90.3,134.9) v4(90.3,138.2)
  Inner3 w0.1: v4(90.3,138.2) 90.3,138.65 93.015,138.65 93.015,137.165 v2(92.9,137.05)
  Bottom Layer w0.1: R1_R51.2@89.2,138.692 89.2,138.53 90.15,138.53 90.3,138.38 v4(90.3,138.2) ; pad.JR7@89.784,134.301 89.9,134.417 89.9,134.5 v2(90.3,134.9)
I2C_SDA_R52: pad.JR7@108.784,134.302 R1_R52.2 U1_R52.H4 U3_R52.1 | length 11.3
  Top Layer w0.1: U1_R52.H4@109.3,137.349 v4(109.3,138.2)
  Inner2 w0.1: v2(109.3,134.9) v4(109.3,138.2)
  Inner3 w0.1: v4(109.3,138.2) 109.3,138.65 112.015,138.65 112.015,137.165 v2(111.9,137.05)
  Bottom Layer w0.1: R1_R52.2@108.2,138.693 108.2,138.53 109.15,138.53 109.3,138.38 v4(109.3,138.2) ; pad.JR7@108.784,134.301 108.9,134.417 108.9,134.5 v2(109.3,134.9)
I2C_SDA_R53: pad.JR7@127.785,134.302 R1_R53.2 U1_R53.H4 U3_R53.1 | length 11.3
  Top Layer w0.1: U1_R53.H4@128.3,137.349 v4(128.3,138.2)
  Inner2 w0.1: v2(128.3,134.9) v4(128.3,138.2)
  Inner3 w0.1: v4(128.3,138.2) 128.3,138.65 131.015,138.65 131.015,137.165 v2(130.9,137.05)
  Bottom Layer w0.1: R1_R53.2@127.2,138.692 127.2,138.53 128.15,138.53 128.3,138.38 v4(128.3,138.2) ; pad.JR7@127.784,134.301 127.9,134.417 127.9,134.5 v2(128.3,134.9)
I2C_SDA_R54: pad.JR7@146.785,134.302 R1_R54.2 U1_R54.H4 U3_R54.1 | length 11.3
  Top Layer w0.1: U1_R54.H4@147.3,137.349 v4(147.3,138.2)
  Inner2 w0.1: v2(147.3,134.9) v4(147.3,138.2)
  Inner3 w0.1: v4(147.3,138.2) 147.3,138.65 150.015,138.65 150.015,137.165 v2(149.9,137.05)
  Bottom Layer w0.1: R1_R54.2@146.2,138.692 146.2,138.53 147.15,138.53 147.3,138.38 v4(147.3,138.2) ; pad.JR7@146.784,134.301 146.9,134.417 146.9,134.5 v2(147.3,134.9)
IMU_INT1_P11: pad.JP5@86.274,89.781 U11_P11.4 | length 3.4
  Top Layer w0.1: v3(83.9,89.55) 84.149,89.301 U11_P11.4@84.15,89.275
  Inner3 w0.1: v3(83.9,89.55) 84.325,89.125 85.9,89.125 86.275,89.5 v2(86.275,89.781)
IMU_INT1_P12: pad.JP5@105.276,89.781 U11_P12.4 | length 3.4
  Top Layer w0.1: v3(102.9,89.55) 103.149,89.301 U11_P12.4@103.15,89.275
  Inner3 w0.1: v3(102.9,89.55) 103.325,89.125 104.9,89.125 105.275,89.5 v2(105.275,89.781)
IMU_INT1_P13: pad.JP5@124.275,89.781 U11_P13.4 | length 3.4
  Top Layer w0.1: v3(121.9,89.55) 122.149,89.301 U11_P13.4@122.149,89.275
  Inner3 w0.1: v3(121.9,89.55) 122.325,89.125 123.9,89.125 124.275,89.5 v2(124.275,89.781)
IMU_INT1_P14: pad.JP5@143.274,89.781 U11_P14.4 | length 3.4
  Top Layer w0.1: v3(140.9,89.55) 141.149,89.301 U11_P14.4@141.15,89.275
  Inner3 w0.1: v3(140.9,89.55) 141.325,89.125 142.9,89.125 143.275,89.5 v2(143.275,89.781)
IMU_INT1_P21: pad.JP5@86.274,101.581 U11_P21.4 | length 3.4
  Top Layer w0.1: v3(83.9,101.35) 84.149,101.101 U11_P21.4@84.15,101.075
  Inner3 w0.1: v3(83.9,101.35) 84.325,100.925 85.9,100.925 86.275,101.3 v2(86.275,101.581)
IMU_INT1_P22: pad.JP5@105.276,101.581 U11_P22.4 | length 3.4
  Top Layer w0.1: v3(102.9,101.35) 103.149,101.101 U11_P22.4@103.15,101.075
  Inner3 w0.1: v3(102.9,101.35) 103.325,100.925 104.9,100.925 105.275,101.3 v2(105.275,101.581)
IMU_INT1_P23: pad.JP5@124.275,101.581 U11_P23.4 | length 3.4
  Top Layer w0.1: v3(121.9,101.35) 122.149,101.101 U11_P23.4@122.149,101.075
  Inner3 w0.1: v3(121.9,101.35) 122.325,100.925 123.9,100.925 124.275,101.3 v2(124.275,101.581)
IMU_INT1_P24: pad.JP5@143.274,101.581 U11_P24.4 | length 3.4
  Top Layer w0.1: v3(140.9,101.35) 141.149,101.101 U11_P24.4@141.15,101.075
  Inner3 w0.1: v3(140.9,101.35) 141.325,100.925 142.9,100.925 143.275,101.3 v2(143.275,101.581)
IMU_INT1_P31: pad.JP5@86.274,113.38 U11_P31.4 | length 3.4
  Top Layer w0.1: v3(83.9,113.15) 84.149,112.901 U11_P31.4@84.15,112.875
  Inner3 w0.1: v3(83.9,113.15) 84.325,112.725 85.9,112.725 86.275,113.1 v2(86.275,113.381)
IMU_INT1_P32: pad.JP5@105.276,113.38 U11_P32.4 | length 3.4
  Top Layer w0.1: v3(102.9,113.15) 103.149,112.901 U11_P32.4@103.15,112.875
  Inner3 w0.1: v3(102.9,113.15) 103.325,112.725 104.9,112.725 105.275,113.1 v2(105.275,113.381)
IMU_INT1_P33: pad.JP5@124.275,113.38 U11_P33.4 | length 3.4
  Top Layer w0.1: v3(121.9,113.15) 122.149,112.901 U11_P33.4@122.149,112.875
  Inner3 w0.1: v3(121.9,113.15) 122.325,112.725 123.9,112.725 124.275,113.1 v2(124.275,113.381)
IMU_INT1_P34: pad.JP5@143.274,113.38 U11_P34.4 | length 3.4
  Top Layer w0.1: v3(140.9,113.15) 141.149,112.901 U11_P34.4@141.15,112.875
  Inner3 w0.1: v3(140.9,113.15) 141.325,112.725 142.9,112.725 143.275,113.1 v2(143.275,113.381)
IMU_INT1_P41: pad.JP5@86.274,125.181 U11_P41.4 | length 3.4
  Top Layer w0.1: v3(83.9,124.95) 84.149,124.701 U11_P41.4@84.15,124.675
  Inner3 w0.1: v3(83.9,124.95) 84.325,124.525 85.9,124.525 86.275,124.9 v2(86.275,125.181)
IMU_INT1_P42: pad.JP5@105.276,125.181 U11_P42.4 | length 3.4
  Top Layer w0.1: v3(102.9,124.95) 103.149,124.701 U11_P42.4@103.15,124.675
  Inner3 w0.1: v3(102.9,124.95) 103.325,124.525 104.9,124.525 105.275,124.9 v2(105.275,125.181)
IMU_INT1_P43: pad.JP5@124.275,125.181 U11_P43.4 | length 3.4
  Top Layer w0.1: v3(121.9,124.95) 122.149,124.701 U11_P43.4@122.149,124.675
  Inner3 w0.1: v3(121.9,124.95) 122.325,124.525 123.9,124.525 124.275,124.9 v2(124.275,125.181)
IMU_INT1_P44: pad.JP5@143.274,125.181 U11_P44.4 | length 3.4
  Top Layer w0.1: v3(140.9,124.95) 141.149,124.701 U11_P44.4@141.15,124.675
  Inner3 w0.1: v3(140.9,124.95) 141.325,124.525 142.9,124.525 143.275,124.9 v2(143.275,125.181)
IMU_INT1_P51: pad.JP5@86.274,136.981 U11_P51.4 | length 3.4
  Top Layer w0.1: v3(83.9,136.75) 84.149,136.501 U11_P51.4@84.15,136.475
  Inner3 w0.1: v3(83.9,136.75) 84.325,136.325 85.9,136.325 86.275,136.7 v2(86.275,136.981)
IMU_INT1_P52: pad.JP5@105.276,136.981 U11_P52.4 | length 3.4
  Top Layer w0.1: v3(102.9,136.75) 103.149,136.501 U11_P52.4@103.15,136.475
  Inner3 w0.1: v3(102.9,136.75) 103.325,136.325 104.9,136.325 105.275,136.7 v2(105.275,136.981)
IMU_INT1_P53: pad.JP5@124.275,136.981 U11_P53.4 | length 3.4
  Top Layer w0.1: v3(121.9,136.75) 122.149,136.501 U11_P53.4@122.149,136.475
  Inner3 w0.1: v3(121.9,136.75) 122.325,136.325 123.9,136.325 124.275,136.7 v2(124.275,136.981)
IMU_INT1_P54: pad.JP5@143.274,136.981 U11_P54.4 | length 3.4
  Top Layer w0.1: v3(140.9,136.75) 141.149,136.501 U11_P54.4@141.15,136.475
  Inner3 w0.1: v3(140.9,136.75) 141.325,136.325 142.9,136.325 143.275,136.7 v2(143.275,136.981)
IMU_INT1_R11: pad.JR5@89.185,90.101 U1_R11.H6 | length 1.1
  Top Layer w0.1: U1_R11.H6@89.5,90.15 89.5,90.58 v4(89.52,90.6)
  Bottom Layer w0.1: pad.JR5@89.185,90.101 89.185,90.265 v4(89.52,90.6)
IMU_INT1_R12: pad.JR5@108.184,90.101 U1_R12.H6 | length 1.1
  Top Layer w0.1: U1_R12.H6@108.5,90.15 108.5,90.58 v4(108.52,90.6)
  Bottom Layer w0.1: pad.JR5@108.185,90.101 108.185,90.265 v4(108.52,90.6)
IMU_INT1_R13: pad.JR5@127.186,90.101 U1_R13.H6 | length 1.1
  Top Layer w0.1: U1_R13.H6@127.5,90.15 127.5,90.58 v4(127.52,90.6)
  Bottom Layer w0.1: pad.JR5@127.186,90.101 127.185,90.265 v4(127.52,90.6)
IMU_INT1_R14: pad.JR5@146.185,90.101 U1_R14.H6 | length 1.1
  Top Layer w0.1: U1_R14.H6@146.5,90.15 146.5,90.58 v4(146.52,90.6)
  Bottom Layer w0.1: pad.JR5@146.185,90.101 146.185,90.265 v4(146.52,90.6)
IMU_INT1_R21: pad.JR5@89.185,101.901 U1_R21.H6 | length 1.1
  Top Layer w0.1: U1_R21.H6@89.5,101.949 89.5,102.38 v4(89.52,102.4)
  Bottom Layer w0.1: pad.JR5@89.185,101.901 89.185,102.065 v4(89.52,102.4)
IMU_INT1_R22: pad.JR5@108.184,101.901 U1_R22.H6 | length 1.1
  Top Layer w0.1: U1_R22.H6@108.5,101.949 108.5,102.38 v4(108.52,102.4)
  Bottom Layer w0.1: pad.JR5@108.185,101.901 108.185,102.065 v4(108.52,102.4)
IMU_INT1_R23: pad.JR5@127.186,101.901 U1_R23.H6 | length 1.1
  Top Layer w0.1: U1_R23.H6@127.5,101.949 127.5,102.38 v4(127.52,102.4)
  Bottom Layer w0.1: pad.JR5@127.185,101.901 127.185,102.065 v4(127.52,102.4)
IMU_INT1_R24: pad.JR5@146.185,101.901 U1_R24.H6 | length 1.1
  Top Layer w0.1: U1_R24.H6@146.5,101.949 146.5,102.38 v4(146.52,102.4)
  Bottom Layer w0.1: pad.JR5@146.185,101.901 146.185,102.065 v4(146.52,102.4)
IMU_INT1_R31: pad.JR5@89.185,113.7 U1_R31.H6 | length 1.1
  Top Layer w0.1: U1_R31.H6@89.5,113.75 89.5,114.18 v4(89.52,114.2)
  Bottom Layer w0.1: pad.JR5@89.185,113.7 89.185,113.865 v4(89.52,114.2)
IMU_INT1_R32: pad.JR5@108.184,113.7 U1_R32.H6 | length 1.1
  Top Layer w0.1: U1_R32.H6@108.5,113.75 108.5,114.18 v4(108.52,114.2)
  Bottom Layer w0.1: pad.JR5@108.185,113.701 108.185,113.865 v4(108.52,114.2)
IMU_INT1_R33: pad.JR5@127.186,113.7 U1_R33.H6 | length 1.1
  Top Layer w0.1: U1_R33.H6@127.5,113.75 127.5,114.18 v4(127.52,114.2)
  Bottom Layer w0.1: pad.JR5@127.186,113.7 127.185,113.865 v4(127.52,114.2)
IMU_INT1_R34: pad.JR5@146.185,113.7 U1_R34.H6 | length 1.1
  Top Layer w0.1: U1_R34.H6@146.5,113.75 146.5,114.18 v4(146.52,114.2)
  Bottom Layer w0.1: pad.JR5@146.185,113.7 146.185,113.865 v4(146.52,114.2)
IMU_INT1_R41: pad.JR5@89.185,125.501 U1_R41.H6 | length 1.1
  Top Layer w0.1: U1_R41.H6@89.5,125.55 89.5,125.98 v4(89.52,126)
  Bottom Layer w0.1: pad.JR5@89.185,125.501 89.185,125.665 v4(89.52,126)
IMU_INT1_R42: pad.JR5@108.184,125.501 U1_R42.H6 | length 1.1
  Top Layer w0.1: U1_R42.H6@108.5,125.55 108.5,125.98 v4(108.52,126)
  Bottom Layer w0.1: pad.JR5@108.185,125.501 108.185,125.665 v4(108.52,126)
IMU_INT1_R43: pad.JR5@127.186,125.501 U1_R43.H6 | length 1.1
  Top Layer w0.1: U1_R43.H6@127.5,125.55 127.5,125.98 v4(127.52,126)
  Bottom Layer w0.1: pad.JR5@127.186,125.501 127.185,125.665 v4(127.52,126)
IMU_INT1_R44: pad.JR5@146.185,125.501 U1_R44.H6 | length 1.1
  Top Layer w0.1: U1_R44.H6@146.5,125.55 146.5,125.98 v4(146.52,126)
  Bottom Layer w0.1: pad.JR5@146.185,125.501 146.185,125.665 v4(146.52,126)
IMU_INT1_R51: pad.JR5@89.185,137.301 U1_R51.H6 | length 1.1
  Top Layer w0.1: U1_R51.H6@89.5,137.349 89.5,137.78 v4(89.52,137.8)
  Bottom Layer w0.1: pad.JR5@89.185,137.301 89.185,137.465 v4(89.52,137.8)
IMU_INT1_R52: pad.JR5@108.184,137.301 U1_R52.H6 | length 1.1
  Top Layer w0.1: U1_R52.H6@108.5,137.349 108.5,137.78 v4(108.52,137.8)
  Bottom Layer w0.1: pad.JR5@108.185,137.301 108.185,137.465 v4(108.52,137.8)
IMU_INT1_R53: pad.JR5@127.186,137.301 U1_R53.H6 | length 1.1
  Top Layer w0.1: U1_R53.H6@127.5,137.349 127.5,137.78 v4(127.52,137.8)
  Bottom Layer w0.1: pad.JR5@127.185,137.301 127.185,137.465 v4(127.52,137.8)
IMU_INT1_R54: pad.JR5@146.185,137.301 U1_R54.H6 | length 1.1
  Top Layer w0.1: U1_R54.H6@146.5,137.349 146.5,137.78 v4(146.52,137.8)
  Bottom Layer w0.1: pad.JR5@146.185,137.301 146.185,137.465 v4(146.52,137.8)
NRESET_TP_R11: pad.TP1@91.951,91.5 U1_R11.H1 | length 1.6
  Top Layer w0.1: U1_R11.H1@91.499,90.149 91.65,90.299 91.65,91.35 91.801,91.35 pad.TP1@91.951,91.5
NRESET_TP_R12: pad.TP1@110.95,91.5 U1_R12.H1 | length 1.6
  Top Layer w0.1: U1_R12.H1@110.5,90.15 110.65,90.299 110.65,91.35 110.801,91.35 pad.TP1@110.95,91.5
NRESET_TP_R13: pad.TP1@129.952,91.5 U1_R13.H1 | length 1.6
  Top Layer w0.1: U1_R13.H1@129.5,90.15 129.65,90.299 129.65,91.35 129.801,91.35 pad.TP1@129.952,91.5
NRESET_TP_R14: pad.TP1@148.951,91.5 U1_R14.H1 | length 1.6
  Top Layer w0.1: U1_R14.H1@148.499,90.149 148.65,90.299 148.65,91.35 148.801,91.35 pad.TP1@148.951,91.5
NRESET_TP_R21: pad.TP1@91.951,103.301 U1_R21.H1 | length 1.6
  Top Layer w0.1: U1_R21.H1@91.499,101.949 91.65,102.099 91.65,103.15 91.801,103.15 pad.TP1@91.951,103.3
NRESET_TP_R22: pad.TP1@110.95,103.301 U1_R22.H1 | length 1.6
  Top Layer w0.1: U1_R22.H1@110.499,101.949 110.65,102.099 110.65,103.15 110.801,103.15 pad.TP1@110.951,103.3
NRESET_TP_R23: pad.TP1@129.952,103.301 U1_R23.H1 | length 1.6
  Top Layer w0.1: U1_R23.H1@129.499,101.949 129.65,102.099 129.65,103.15 129.801,103.15 pad.TP1@129.951,103.3
NRESET_TP_R24: pad.TP1@148.951,103.301 U1_R24.H1 | length 1.6
  Top Layer w0.1: U1_R24.H1@148.499,101.949 148.65,102.099 148.65,103.15 148.801,103.15 pad.TP1@148.951,103.3
NRESET_TP_R31: pad.TP1@91.951,115.099 U1_R31.H1 | length 1.6
  Top Layer w0.1: U1_R31.H1@91.499,113.749 91.65,113.899 91.65,114.95 91.801,114.95 pad.TP1@91.951,115.099
NRESET_TP_R32: pad.TP1@110.95,115.099 U1_R32.H1 | length 1.6
  Top Layer w0.1: U1_R32.H1@110.5,113.75 110.65,113.899 110.65,114.95 110.801,114.95 pad.TP1@110.95,115.099
NRESET_TP_R33: pad.TP1@129.952,115.099 U1_R33.H1 | length 1.6
  Top Layer w0.1: U1_R33.H1@129.5,113.75 129.65,113.899 129.65,114.95 129.801,114.95 pad.TP1@129.952,115.099
NRESET_TP_R34: pad.TP1@148.951,115.099 U1_R34.H1 | length 1.6
  Top Layer w0.1: U1_R34.H1@148.499,113.749 148.65,113.899 148.65,114.95 148.801,114.95 pad.TP1@148.951,115.099
NRESET_TP_R41: pad.TP1@91.951,126.9 U1_R41.H1 | length 1.6
  Top Layer w0.1: U1_R41.H1@91.499,125.549 91.65,125.699 91.65,126.75 91.801,126.75 pad.TP1@91.951,126.9
NRESET_TP_R42: pad.TP1@110.95,126.9 U1_R42.H1 | length 1.6
  Top Layer w0.1: U1_R42.H1@110.5,125.55 110.65,125.699 110.65,126.75 110.801,126.75 pad.TP1@110.95,126.9
NRESET_TP_R43: pad.TP1@129.952,126.9 U1_R43.H1 | length 1.6
  Top Layer w0.1: U1_R43.H1@129.5,125.55 129.65,125.699 129.65,126.75 129.801,126.75 pad.TP1@129.952,126.9
NRESET_TP_R44: pad.TP1@148.951,126.9 U1_R44.H1 | length 1.6
  Top Layer w0.1: U1_R44.H1@148.499,125.549 148.65,125.699 148.65,126.75 148.801,126.75 pad.TP1@148.951,126.9
NRESET_TP_R51: pad.TP1@91.951,138.701 U1_R51.H1 | length 1.6
  Top Layer w0.1: U1_R51.H1@91.499,137.349 91.65,137.499 91.65,138.55 91.801,138.55 pad.TP1@91.951,138.7
NRESET_TP_R52: pad.TP1@110.95,138.701 U1_R52.H1 | length 1.6
  Top Layer w0.1: U1_R52.H1@110.499,137.349 110.65,137.499 110.65,138.55 110.801,138.55 pad.TP1@110.951,138.7
NRESET_TP_R53: pad.TP1@129.952,138.701 U1_R53.H1 | length 1.6
  Top Layer w0.1: U1_R53.H1@129.499,137.349 129.65,137.499 129.65,138.55 129.801,138.55 pad.TP1@129.951,138.7
NRESET_TP_R54: pad.TP1@148.951,138.701 U1_R54.H1 | length 1.6
  Top Layer w0.1: U1_R54.H1@148.499,137.349 148.65,137.499 148.65,138.55 148.801,138.55 pad.TP1@148.951,138.7
NTC_EN_R11: R10_R11.1 R11_R11.1 U1_R11.G3 | length 3.1
  Top Layer w0.1: v3(92,90.45) 92.008,90.45 R11_R11.1@92.258,90.7
  Inner2 w0.1: v3(90.699,89.75) 91.31,90.36 91.44,90.36 ; v2(91.44,90.9) 91.44,90.36 ; v3(92,90.45) 92,90.36 91.44,90.36
  Bottom Layer w0.1: v2(91.44,90.9) R10_R11.1@91.441,91.5
NTC_EN_R12: R10_R12.1 R11_R12.1 U1_R12.G3 | length 3.1
  Top Layer w0.1: v3(111,90.45) 111.008,90.45 R11_R12.1@111.258,90.7
  Inner2 w0.1: v3(109.699,89.75) 110.31,90.36 110.44,90.36 ; v2(110.44,90.9) 110.44,90.36 ; v3(111,90.45) 111,90.36 110.44,90.36
  Bottom Layer w0.1: v2(110.44,90.9) R10_R12.1@110.442,91.5
NTC_EN_R13: R10_R13.1 R11_R13.1 U1_R13.G3 | length 3.1
  Top Layer w0.1: v3(130,90.45) 130.008,90.45 R11_R13.1@130.258,90.7
  Inner2 w0.1: v3(128.699,89.75) 129.31,90.36 129.44,90.36 ; v2(129.44,90.9) 129.44,90.36 ; v3(130,90.45) 130,90.36 129.44,90.36
  Bottom Layer w0.1: v2(129.44,90.9) R10_R13.1@129.442,91.5
NTC_EN_R14: R10_R14.1 R11_R14.1 U1_R14.G3 | length 3.1
  Top Layer w0.1: v3(149,90.45) 149.008,90.45 R11_R14.1@149.258,90.7
  Inner2 w0.1: v3(147.699,89.75) 148.31,90.36 148.44,90.36 ; v2(148.44,90.9) 148.44,90.36 ; v3(149,90.45) 149,90.36 148.44,90.36
  Bottom Layer w0.1: v2(148.44,90.9) R10_R14.1@148.441,91.5
NTC_EN_R21: R10_R21.1 R11_R21.1 U1_R21.G3 | length 3.1
  Top Layer w0.1: v3(92,102.25) 92.008,102.25 R11_R21.1@92.258,102.5
  Inner2 w0.1: v3(90.699,101.55) 91.31,102.16 91.44,102.16 ; v2(91.44,102.7) 91.44,102.16 ; v3(92,102.25) 92,102.16 91.44,102.16
  Bottom Layer w0.1: v2(91.44,102.7) R10_R21.1@91.441,103.3
NTC_EN_R22: R10_R22.1 R11_R22.1 U1_R22.G3 | length 3.1
  Top Layer w0.1: v3(111,102.25) 111.008,102.25 R11_R22.1@111.258,102.5
  Inner2 w0.1: v3(109.699,101.55) 110.31,102.16 110.44,102.16 ; v2(110.44,102.7) 110.44,102.16 ; v3(111,102.25) 111,102.16 110.44,102.16
  Bottom Layer w0.1: v2(110.44,102.7) R10_R22.1@110.442,103.3
NTC_EN_R23: R10_R23.1 R11_R23.1 U1_R23.G3 | length 3.1
  Top Layer w0.1: v3(130,102.25) 130.008,102.25 R11_R23.1@130.258,102.5
  Inner2 w0.1: v3(128.699,101.55) 129.31,102.16 129.44,102.16 ; v2(129.44,102.7) 129.44,102.16 ; v3(130,102.25) 130,102.16 129.44,102.16
  Bottom Layer w0.1: v2(129.44,102.7) R10_R23.1@129.442,103.3
NTC_EN_R24: R10_R24.1 R11_R24.1 U1_R24.G3 | length 3.1
  Top Layer w0.1: v3(149,102.25) 149.008,102.25 R11_R24.1@149.258,102.5
  Inner2 w0.1: v3(147.699,101.55) 148.31,102.16 148.44,102.16 ; v2(148.44,102.7) 148.44,102.16 ; v3(149,102.25) 149,102.16 148.44,102.16
  Bottom Layer w0.1: v2(148.44,102.7) R10_R24.1@148.441,103.3
NTC_EN_R31: R10_R31.1 R11_R31.1 U1_R31.G3 | length 3.1
  Top Layer w0.1: v3(92,114.05) 92.008,114.05 R11_R31.1@92.258,114.3
  Inner2 w0.1: v3(90.699,113.35) 91.31,113.96 91.44,113.96 ; v2(91.44,114.5) 91.44,113.96 ; v3(92,114.05) 92,113.96 91.44,113.96
  Bottom Layer w0.1: v2(91.44,114.5) R10_R31.1@91.441,115.1
NTC_EN_R32: R10_R32.1 R11_R32.1 U1_R32.G3 | length 3.1
  Top Layer w0.1: v3(111,114.05) 111.008,114.05 R11_R32.1@111.258,114.3
  Inner2 w0.1: v3(109.699,113.35) 110.31,113.96 110.44,113.96 ; v2(110.44,114.5) 110.44,113.96 ; v3(111,114.05) 111,113.96 110.44,113.96
  Bottom Layer w0.1: v2(110.44,114.5) R10_R32.1@110.442,115.1
NTC_EN_R33: R10_R33.1 R11_R33.1 U1_R33.G3 | length 3.1
  Top Layer w0.1: v3(130,114.05) 130.008,114.05 R11_R33.1@130.258,114.3
  Inner2 w0.1: v3(128.699,113.35) 129.31,113.96 129.44,113.96 ; v2(129.44,114.5) 129.44,113.96 ; v3(130,114.05) 130,113.96 129.44,113.96
  Bottom Layer w0.1: v2(129.44,114.5) R10_R33.1@129.442,115.1
NTC_EN_R34: R10_R34.1 R11_R34.1 U1_R34.G3 | length 3.1
  Top Layer w0.1: v3(149,114.05) 149.008,114.05 R11_R34.1@149.258,114.3
  Inner2 w0.1: v3(147.699,113.35) 148.31,113.96 148.44,113.96 ; v2(148.44,114.5) 148.44,113.96 ; v3(149,114.05) 149,113.96 148.44,113.96
  Bottom Layer w0.1: v2(148.44,114.5) R10_R34.1@148.441,115.1
NTC_EN_R41: R10_R41.1 R11_R41.1 U1_R41.G3 | length 3.1
  Top Layer w0.1: v3(92,125.85) 92.008,125.85 R11_R41.1@92.258,126.1
  Inner2 w0.1: v3(90.699,125.15) 91.31,125.76 91.44,125.76 ; v2(91.44,126.3) 91.44,125.76 ; v3(92,125.85) 92,125.76 91.44,125.76
  Bottom Layer w0.1: v2(91.44,126.3) R10_R41.1@91.441,126.9
NTC_EN_R42: R10_R42.1 R11_R42.1 U1_R42.G3 | length 3.1
  Top Layer w0.1: v3(111,125.85) 111.008,125.85 R11_R42.1@111.258,126.1
  Inner2 w0.1: v3(109.699,125.15) 110.31,125.76 110.44,125.76 ; v2(110.44,126.3) 110.44,125.76 ; v3(111,125.85) 111,125.76 110.44,125.76
  Bottom Layer w0.1: v2(110.44,126.3) R10_R42.1@110.442,126.9
NTC_EN_R43: R10_R43.1 R11_R43.1 U1_R43.G3 | length 3.1
  Top Layer w0.1: v3(130,125.85) 130.008,125.85 R11_R43.1@130.258,126.1
  Inner2 w0.1: v3(128.699,125.15) 129.31,125.76 129.44,125.76 ; v2(129.44,126.3) 129.44,125.76 ; v3(130,125.85) 130,125.76 129.44,125.76
  Bottom Layer w0.1: v2(129.44,126.3) R10_R43.1@129.442,126.9
NTC_EN_R44: R10_R44.1 R11_R44.1 U1_R44.G3 | length 3.1
  Top Layer w0.1: v3(149,125.85) 149.008,125.85 R11_R44.1@149.258,126.1
  Inner2 w0.1: v3(147.699,125.15) 148.31,125.76 148.44,125.76 ; v2(148.44,126.3) 148.44,125.76 ; v3(149,125.85) 149,125.76 148.44,125.76
  Bottom Layer w0.1: v2(148.44,126.3) R10_R44.1@148.441,126.9
NTC_EN_R51: R10_R51.1 R11_R51.1 U1_R51.G3 | length 3.1
  Top Layer w0.1: v3(92,137.65) 92.008,137.65 R11_R51.1@92.258,137.9
  Inner2 w0.1: v3(90.699,136.95) 91.31,137.56 91.44,137.56 ; v2(91.44,138.1) 91.44,137.56 ; v3(92,137.65) 92,137.56 91.44,137.56
  Bottom Layer w0.1: v2(91.44,138.1) R10_R51.1@91.441,138.7
NTC_EN_R52: R10_R52.1 R11_R52.1 U1_R52.G3 | length 3.1
  Top Layer w0.1: v3(111,137.65) 111.008,137.65 R11_R52.1@111.258,137.9
  Inner2 w0.1: v3(109.699,136.95) 110.31,137.56 110.44,137.56 ; v2(110.44,138.1) 110.44,137.56 ; v3(111,137.65) 111,137.56 110.44,137.56
  Bottom Layer w0.1: v2(110.44,138.1) R10_R52.1@110.442,138.7
NTC_EN_R53: R10_R53.1 R11_R53.1 U1_R53.G3 | length 3.1
  Top Layer w0.1: v3(130,137.65) 130.008,137.65 R11_R53.1@130.258,137.9
  Inner2 w0.1: v3(128.699,136.95) 129.31,137.56 129.44,137.56 ; v2(129.44,138.1) 129.44,137.56 ; v3(130,137.65) 130,137.56 129.44,137.56
  Bottom Layer w0.1: v2(129.44,138.1) R10_R53.1@129.442,138.7
NTC_EN_R54: R10_R54.1 R11_R54.1 U1_R54.G3 | length 3.1
  Top Layer w0.1: v3(149,137.65) 149.008,137.65 R11_R54.1@149.258,137.9
  Inner2 w0.1: v3(147.699,136.95) 148.31,137.56 148.44,137.56 ; v2(148.44,138.1) 148.44,137.56 ; v3(149,137.65) 149,137.56 148.44,137.56
  Bottom Layer w0.1: v2(148.44,138.1) R10_R54.1@148.441,138.7
PPG_GPIO_R11: pad.TP2@92.05,91.551 U3_R11.13 | length 3
  Bottom Layer w0.1: U3_R11.13@91.06,89.301 91.65,89.301 91.65,90.676 92.05,91.076 pad.TP2@92.05,91.551